# Altium PCB PCB_ARC_1.0.5.PcbDoc (part 4 of 4)
Units mil, origin at the board's own origin, x right, y up, seen from the top; angles counter-clockwise.
Board outline 3621 x 2945 mil, 2 copper layers (Top Layer, Bottom Layer), stack 62 mil thick; 201 components, 125 nets, 582 pads, 196 vias.
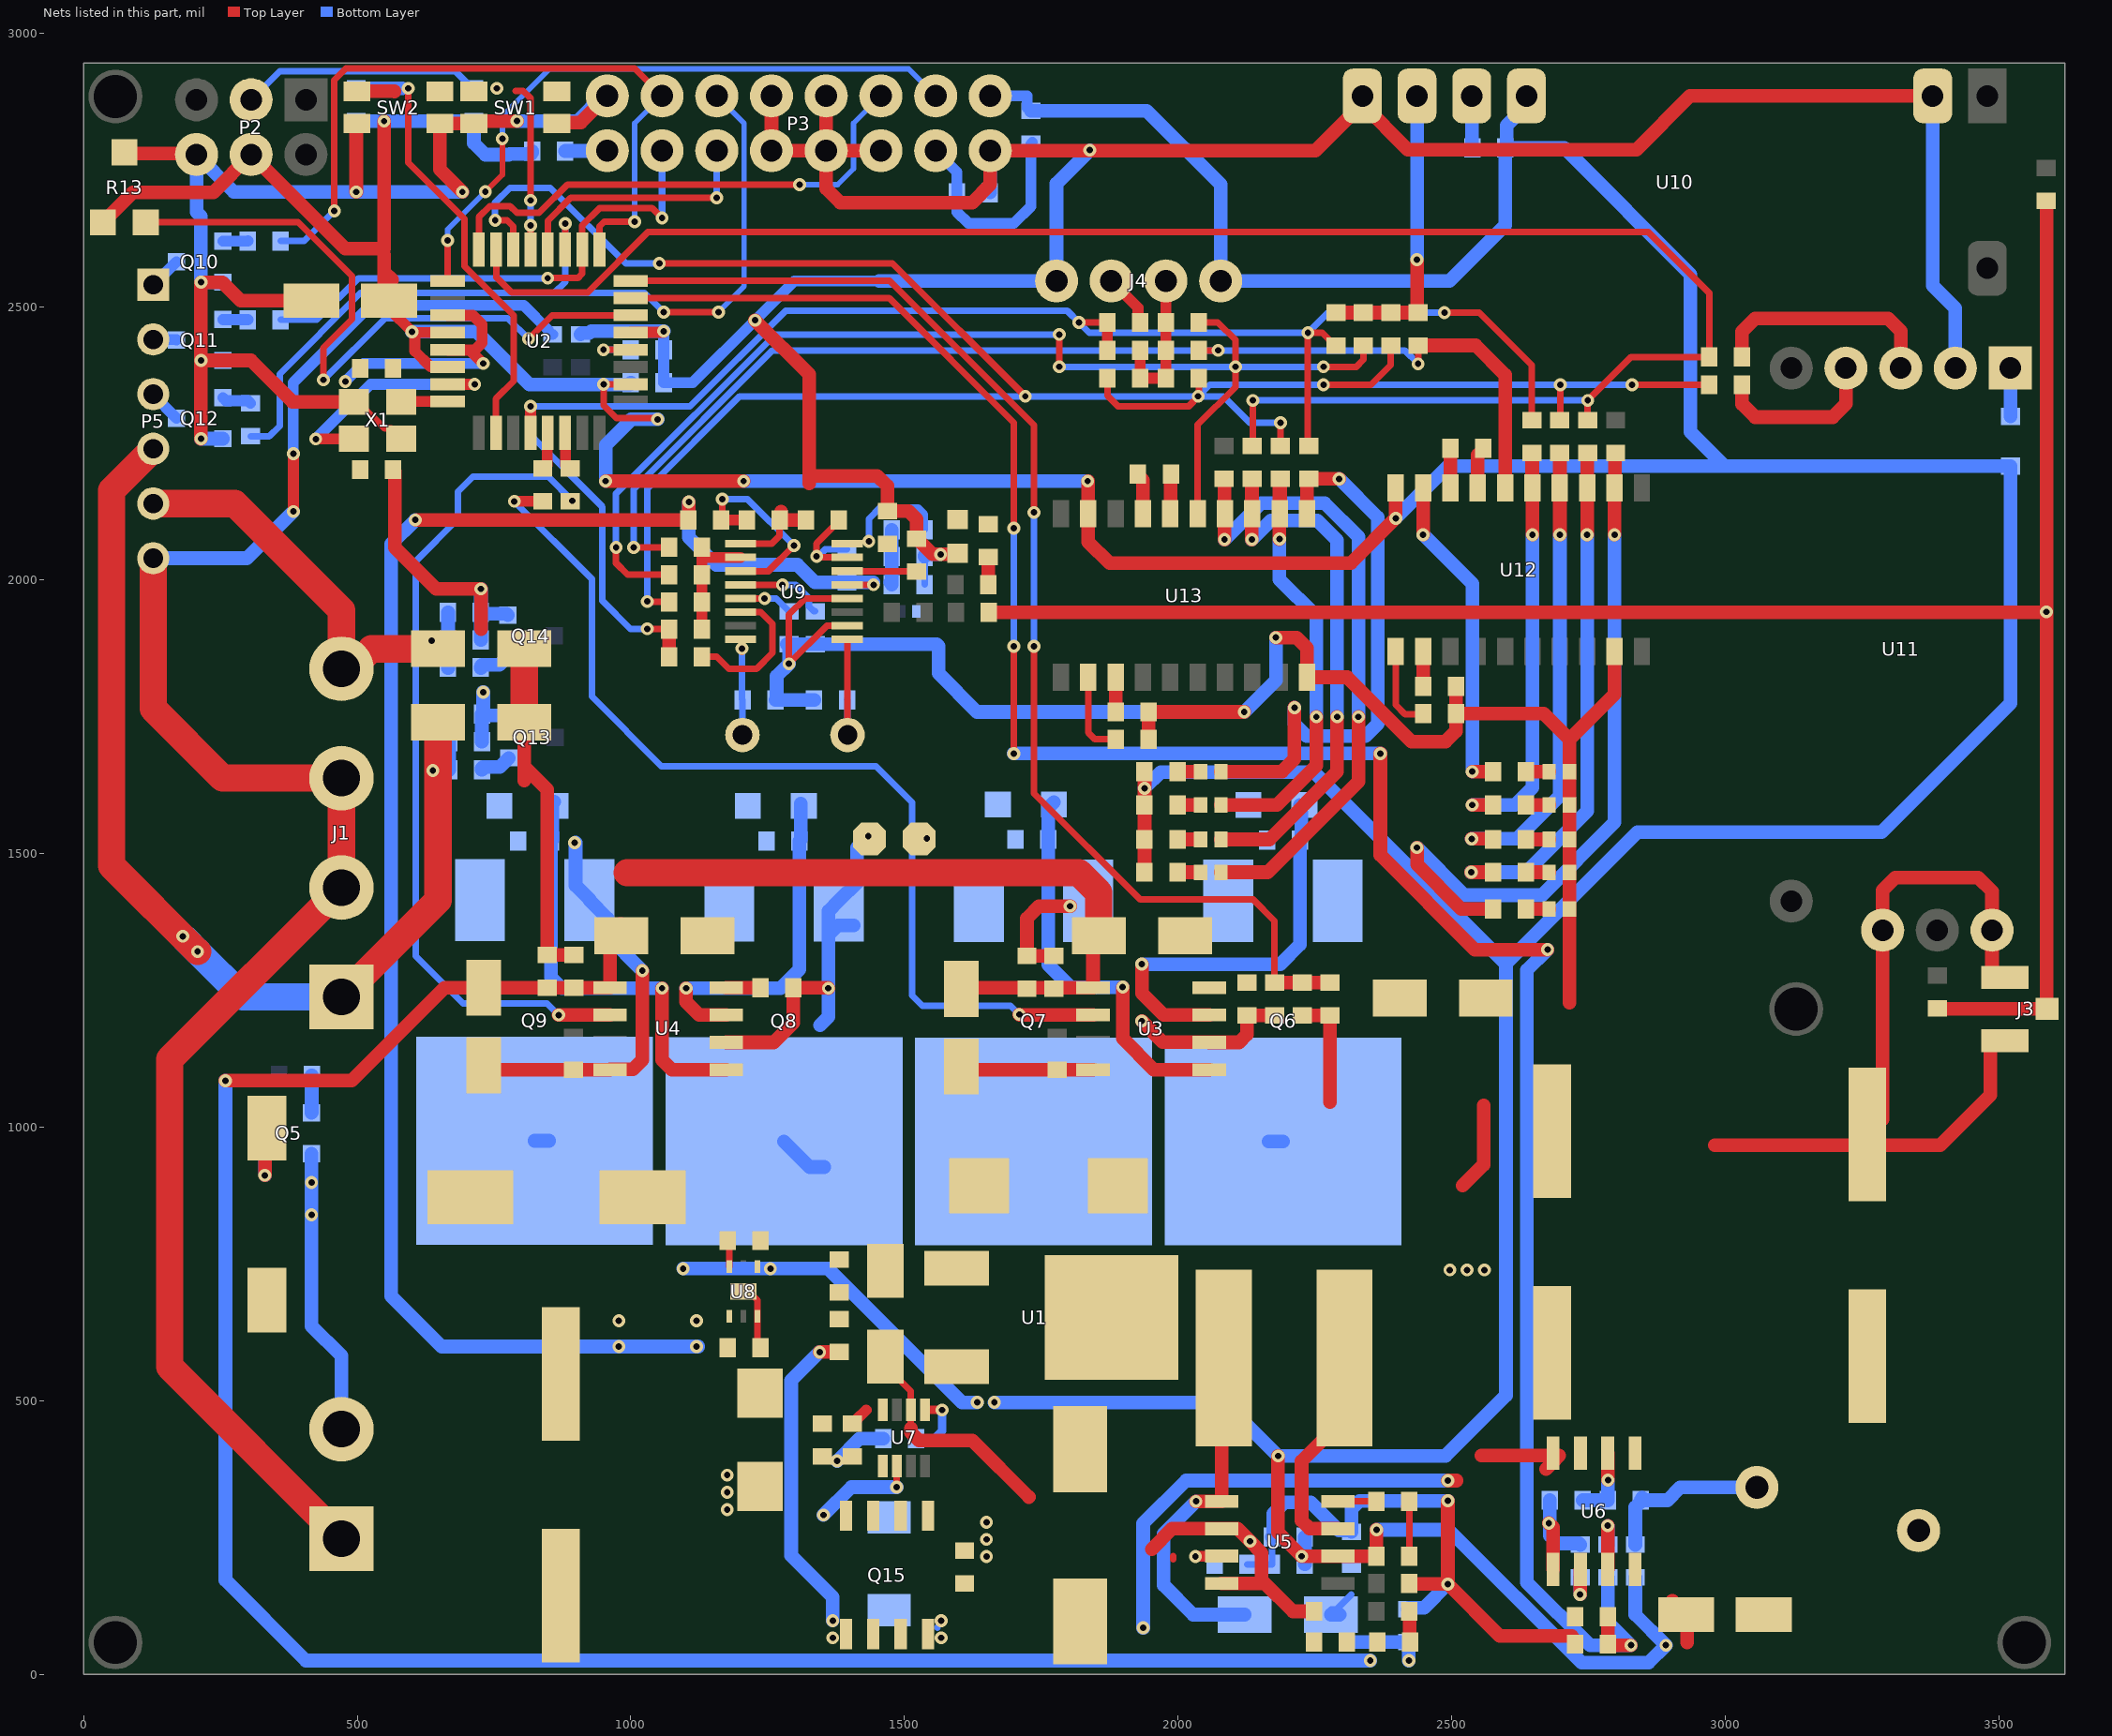
[diagram p2: the nets of this part, all layers, seen from the top]

## Via types
v1: diameter 23.62, hole 11.81, Top Layer to Bottom Layer, tented both sides, 195 vias
v2: diameter 23.62, hole 11.81, Top Layer to Bottom Layer, 1 vias

## Nets (pads, with @x,y where several pads share a name; then routed paths per layer and width w, separated by ;. In a path a pad name is that pad's centre, name@x,y a point inside that pad or via, vN(x,y) a via of type N, cw(c..) or ccw(c..) an arc to the next point about the centre after c; other vN are vias at no path point) (continued)
CRNT_SNS: C29.1 R34.1 R35.2 U2.23 | length 4275.8
  Top Layer w12: U2.23@999.65,2515.5 1472.5,2515.5 1700,2288 v1(1700,2095) ; v1(1700,1683) v1(1700,1879)
  Top Layer w25: v1(2370,1683) 2370,1497 2542.5,1324.5 v1(2675.5,1324.5) ; R35.2@2786,51 R35.2@2786,55 R35.2@2786,62 ; C29.1@2786,101 R35.2@2786,62 ; R35.2@2787,53 v1(2828,53) ; R35.2@2787,61 R35.2@2786,62
  Bottom Layer w12: v1(1700,1879) v1(1700,2095)
  Bottom Layer w25: v1(1700,1683) v1(2370,1683) ; v1(2675.5,1324.5) 2638,1287 2638,168 2753,53 v1(2828,53) 2785.78,95.22 R34.1@2785.78,176.7
D0: R44.2 SB32.1 U12.15 | length 772.7
  Top Layer w25: v1(2538,1589) R44.2@2576,1589 ; SB32.1@2647,2232 2647.5,2231.5 2647.5,2169.11 U12.15@2648,2168.61 v1(2648,2083)
  Bottom Layer w25: v1(2538,1589) 2616,1589 2648,1621 v1(2648,2083)
D1: R45.2 SB33.1 U12.14 | length 859.7
  Top Layer w25: v1(2537,1527) 2575,1527 R45.2@2576,1526 ; v1(2698,2083) U12.14@2698,2168.61 SB33.1@2698,2232
  Bottom Layer w25: v1(2537,1527) 2620,1527 2698,1605 v1(2698,2083)
D2: R46.2 SB34.1 U12.13 | length 952.8
  Top Layer w25: v1(2536,1466) R46.2@2576,1466 ; v1(2748,2083) U12.13@2748,2168.61 2748.5,2169.11 2748.5,2231.5 SB34.1@2749,2232
  Bottom Layer w25: v1(2536,1466) 2636,1466 2748,1578 v1(2748,2083)
D3: R47.2 SB35.1 U12.12 | length 1331.5
  Top Layer w25: v1(2437,1511) 2437,1480 2518,1399 R47.2@2576,1399 ; v1(2798,2083) U12.12@2798,2168.61 2799,2169.61 2799,2231 SB35.1@2800,2232
  Bottom Layer w25: v1(2437,1511) 2524,1424 2665,1424 2798,1557 v1(2798,2083)
D8: LED1.2 SB16.1 U13.11 | length 1035.7
  Top Layer w25: LED1.2@2078.7,1650 2190,1650 2213,1673 v1(2213,1767) ; U13.11@2236,2121.61 2236,2182.5 2238.5,2185 SB16.1@2239,2185 v1(2294.61,2185)
  Bottom Layer w25: v1(2213,1767) 2213,1737 2235,1715 2343,1715 2365,1737 2365,2114.61 v1(2294.61,2185)
D9: LED2.2 SB17.1 U13.12 | length 819.6
  Top Layer w25: LED2.2@2078.7,1589 2181,1589 2253,1661 v1(2253,1750) ; v1(2185.67,2074.97) SB17.1@2185.67,2184.67 ; U13.12@2186,2121.61 2186.67,2122.27 2186.67,2184.33 SB17.1@2187.33,2185
  Bottom Layer w25: v1(2185.67,2074.97) 2185.67,2001.33 2253,1934 v1(2253,1750)
D10: LED3.2 SB18.1 U13.13 | length 1045
  Top Layer w25: LED3.2@2078.7,1526 2167,1526 2291,1650 v1(2291,1750) ; v1(2135,2074.3) SB18.1@2135,2184 ; SB18.1@2135.67,2185 2135.83,2184.83 2135.83,2121.77 U13.13@2136,2121.61
  Bottom Layer w25: v1(2135,2074.3) 2169.7,2109 2254.75,2109 2291,2072.75 v1(2291,1750)
D11: LED4.2 SB19.1 U13.14 | length 1176.5
  Top Layer w25: LED4.2@2078.7,1466 2164,1466 2330,1632 v1(2330,1750) ; SB19.1@2084,2185 2085,2184 v1(2085,2074.3)
  Bottom Layer w25: v1(2085,2074.3) 2151.7,2141 2268,2141 2330,2079 v1(2330,1750)
DIN_HT12: SB22.2 SB23.2 SB29.2 U13.15 | length 2238.1
  Top Layer w12: v1@970,2062 v1@971.58,2060.42 ; v1(973,2060) 973,2031 994,2010 SB29.2@1070,2010 ; v1(1783,2390) v1(1783,2449) ; U13.15@2036,2121.61 2036,2284 2105,2353 v1(2105,2390) 2105,2439 2073,2471 SB23.2@2038,2471 ; v1(2266,2390) 2326,2390 2339,2403 SB22.2@2339,2429
  Bottom Layer w12: v1(973,2060) 973,2158.08 1263.92,2449 v1(1783,2449) ; v1(1783,2390) v1(2105,2390) v1(2266,2390)
DIN_PT2272: SB20.2 SB21.2 SB28.2 U12.16 | length 2177.3
  Top Layer w12: v1(1005.19,2060) SB28.2@1070,2060 ; SB21.2@2038,2420 v1(2073.67,2420) ; v1(2439,2395.33) SB20.2@2439,2429
  Top Layer w25: SB20.2@2439,2429 2544,2429 2598,2375 U12.16@2598,2168.61
  Bottom Layer w12: v1(1005.19,2060) 1005.19,2166.23 1258.96,2420 v1(2073.67,2420) 2414.33,2420 v1(2439,2395.33)
DOUT_MICRF: SB28.1 SB29.1 SB30.1 SB31.1 U9.10 | length 220.6
  Top Layer w20: SB31.1@1130,1910 SB30.1@1130,1960 SB29.1@1130,2010 1130,2041.5 ; SB28.1@1130,2060 1130,2041.5 ; U9.10@1200.56,2041.5 1130,2041.5
DOUT_SRX882: SB20.1 SB22.1 SB24.1 SB26.1 U10.5 | length 543.2
  Top Layer w25: SB26.1@2289,2489 SB22.1@2339,2489 SB24.1@2389,2489 SB20.1@2439,2489 2437,2491 v1@2437,2583 ; U10.5@2437,2885 U10.5@2438,2884
  Bottom Layer w25: v1@2437,2588 U10.5@2437,2885
  other v1: 2437,2586
DRV_IN: SB1.1 U3.2 | length 1831.4
  Top Layer w20: v1(787.02,2144) SB1.1@839,2144
  Top Layer w25: v1(1710,1206) 1711,1205 U3.2@1844.7,1205
  Bottom Layer w12: v1(787.02,2144) 929,2002.02 929,1787 1056,1660 1448,1660 1514,1594 1514,1241 1533,1222 1694,1222 v1(1710,1206)
DRV_IN2: SB6.1 U4.2 | length 1519.7
  Top Layer w25: v1(868,1205) U4.2@961.7,1205
  Bottom Layer w12: v1(868,1205) 847,1226 693,1226 606.5,1312.5 606.5,2034.5 683.75,2111.75 683.75,2161.75 711,2189 849,2189 v1(893,2145)
DT: J4.2 SB4.2 SB21.1 SB23.1 SB25.1 SB27.1 | length 273.5
  Top Layer w20: SB27.1@1931,2420 SB25.1@1931,2369 ; SB25.1@1932,2367 1931,2368 SB25.1@1931,2369 ; SB4.2@1977,2378 1978,2379 SB21.1@1978,2420 SB23.1@1978,2471 J4.2@1978,2547 ; SB4.2@1980,2373 1976,2369 SB25.1@1931,2369
EXT_RF: J3.1 SB9.2 SB10.2 SB11.2 | length 3608.9
  Top Layer w25: SB9.2@1654,1941 3586.5,1941 v1(3587.5,1942) ; SB11.2@3389,1216 J3.1@3588.35,1216 ; J3.1@3587.5,1216.85 v1(3587.5,1942) ; SB10.2@3587.5,2692.5 v1(3587.5,1942)
GATE: Q15.4 U7.6 | length 192.4
  Top Layer w12: U7.6@1486.2,380.82 1486.2,345.61 v1@1487.81,344
  Bottom Layer w25: v1(1352,291) 1403,342 v1(1485.81,342)
GND: C1.2 C2.2 C3.2 C4.2 C5.2 C7.2 C8.2 C9.1 C10.1 C11.2 C12.2 C13.2 C16.2 C17.2 C18.2 C19.2 C20.2 C21.1 C22.2 C23.2 C24.2 C25.2 C26.1 C27.1 C28.2 C29.2 C30.2 C31.2 C32.2 C33.2 C34.2 C35.2 C36.2 C38.2 C39.2 C40.2 C41.2 C42.2 C43.1 C44.1 C45.2 C49.2 c.2 D1.2 D4.2 D6.1 D7.1 D9.2 D10.2 J2.2 J3.2 J3.3 J4.4 L2.2 L3.2 LED5.2 LED6.2 LED7.2 LED8.2 LED9.2 P2.6 P3.1 P3.5 P3.7 P3.8 P3.9 P3.10 P3.16 Q5.2 Q7.3 Q9.3 Q10.2 Q11.2 Q12.2 Q13.2 Q14.2 R3.2 R8.1 R13.3 R14.2 R15.2 R17.1 R21.1 R26.2 R30.2 R31.2 R35.1 RV1.2 SB2.2 SB7.2 SB8.2 SB14.1 SB15.1 SB36.1 SB37.1 SW1.2 SW2.2 U1.2 U2.3 U2.5 U2.21 U3.4 U4.4 U5.2 U5.4 U6.5 U7.2 U8.3 U8.7 U9.2 U9.4 U9.9 U10.2 U10.6 U11.2 U11.7 U11.8 U12.9 U13.10 X1.2 X1.4 | length 19624.5
  Top Layer w12: X1.4@493.69,2325.46 501.54,2325.46 550,2277 561.84,2277 X1.2@580.31,2258.54 ; U9.9@1200.56,2066.5 1257.5,2066.5 1272,2081 SB7.2@1272,2110 ; U8.7@1214,706 1214,700.17 1223.21,690.96 1224.15,690.96 1231.18,683.93 U8.3@1231.18,654.45 1231.18,593.82 C45.2@1234,591 ; U9.2@1395.44,1916.5 1358.5,1916.5 v1(1289,1847) 1289,1937 1318.5,1966.5 U9.4@1395.44,1966.5 ; D10.2@1465,580.26 1465,564.51 1511.8,517.72 U7.2@1511.8,483.18 1511.8,449.2 ; 1991,210 1991,216
  Top Layer w20: U2.3@665,2484 711,2484 728,2467 728,2434.01 715,2421.01 U2.5@665,2421.01 665.83,2420.18 705.82,2420.18 v1(730,2396) ; U2.21@999.65,2452.5 1000.14,2453 v1@1060,2453
  Top Layer w25: R13.3@74,2781.98 75.98,2780 117,2780 ; 115.02,2779.99 204.01,2779.99 P2.6@206,2778 ; v1(214.3,2258.6) v1(214.3,2401.6) ; c.2@418,2512.87 c.2@416.13,2511 287,2511 253.4,2544.6 v1(214.3,2544.6) v1(214.3,2401.6) ; X1.4@493.69,2325.46 381.54,2325.46 305.4,2401.6 v1(214.3,2401.6) ; v1(498,2709.63) 498,2835 498.53,2834.47 SW2.2@499.21,2834.47 ; C9.1@565.35,2202 568.35,2199 568.35,2059.65 644,1984 v1(726,1984) 726,1910 ; v1(692,2709.63) 650.79,2750.84 SW2.2@650.79,2834.47 SW1.2@713.21,2834.47 718.05,2839.31 v1(792,2839.31) ; C16.2@731,1113.13 739.13,1105 R15.2@895,1105 U4.4@961.7,1105 962.39,1105.69 1003.69,1105.69 1021,1123 v1(1021,1286) ; 805.06,1633.94 805.06,1658.94 ; D6.1@805.06,1715.41 805.06,1658.94 ; SW1.2@864.79,2834.47 866.62,2836.31 908.31,2836.31 P3.16@957,2885 ; C17.2@896,1315 C18.2@847,1315 847,1617 805.06,1658.94 ; v1(1227,2475) 1326,2376 1326,2177 ; P3.10@1257,2885 P3.9@1257,2785 P3.7@1357,2785 ; SB7.2@1274.5,2125.5 1274.5,2112.5 SB7.2@1272,2110 SB8.2@1320,2110 ; 1339.5,2190.5 1450.5,2190.5 1469,2172 R8.1@1469,2126 1507.36,2126 1522,2111.36 SB2.2@1522,2076 1524.5,2076 1527,2073.5 1527,2071 1551,2047 v1(1566,2047) 1594.91,2047 L3.2@1597,2049.09 ; P3.8@1357,2885 P3.7@1357,2785 ; P3.5@1457,2785 P3.7@1357,2785 ; 1511.8,449.2 1511.8,442.21 1526.44,427.57 1623.82,427.57 1727.39,324 ; C11.2@1604,1111.13 1610.13,1105 R14.2@1779,1105 U3.4@1844.7,1105 ; C12.2@1773,1313 C13.2@1724,1313 1724,1382 1746,1404 v1(1803,1404) ; SB14.1@1946,1709 SB15.1@1946,1759 v1(2121,1759) ; 1952,228.5 1989.5,266 U5.2@2079.7,266 2109,266 v1(2132,243) 2153,222 2153,172 2159,166 ; U5.4@2079.7,166 2159,166 ; v1(2179,1895) 2217,1895 2236,1876 U13.10@2236,1822.39 2309.61,1822.39 2427,1705 2489,1705 2508,1724 SB36.1@2508,1756 ; R17.1@2227.33,1204 C28.2@2278,1204 2278,1046 ; R21.1@2249,115 2210,115 2159,166 ; U10.6@2337,2885 U10.6@2337,2870.43 ; C24.2@2423,166 2424.5,166 2425.5,165 v1@2493.3,165 ; v1(2493.3,164.85) v1@2493.3,165 ; v1(2493.3,317) v1@2493.3,165 ; SB37.1@2508,1806 SB36.1@2508,1756 ; 2520.5,893 2559,931.5 2559,1040 ; v1(2678,276) 2685.56,268.44 U6.5@2685.56,191.7 ; 2715.7,1227.7 LED8.2@2715.7,1399 LED7.2@2715.7,1466 LED6.2@2715.7,1526 LED5.2@2715.7,1589 LED9.2@2715.7,1650 2715.7,1708.7 ; R35.1@2720,68 R35.1@2726,62 ; R35.1@2720,70 2588.3,70 v1@2493.3,165 ; U12.9@2798,1869.39 2798,1791 2715.7,1708.7 ; 2981,967 3393,967 3484.65,1058.65 J3.3@3484.65,1157.93 ; C34.2@3260,986.56 3288,1014.56 U11.8@3288,1360 3288,1433 3311,1456 3463,1456 3488,1431 U11.7@3488,1360 J3.2@3488,1277.43 ; U10.2@3379.52,2885 2936,2885 2838,2787 2420.43,2787 U10.6@2337,2870.43 ; P3.7@1357,2785 1357,2716 1383,2690 1624,2690 1657,2723 P3.1@1657,2785 1839,2785 2251.57,2785 U10.6@2337,2870.43 ; SB36.1@2508,1756 2668.4,1756 2715.7,1708.7
  Top Layer w50: D6.1@805.06,1740.41 D7.1@805.06,1874.41
  Bottom Layer w12: C40.2@1536.78,1992 C41.2@1536.78,2043 ; C21.1@2127,201 C20.2@2172,201 C19.2@2172,251
  Bottom Layer w20: v1(478,2363) 511,2396 v1(730,2396) ; v1(1060,2455) C8.2@1060,2421 C7.2@1060,2361 1113,2361 v1(1227,2475) 1299,2547 1454,2547 ; R26.2@1656,2708 R26.2@1656.5,2708.5 ; P3.1@1656.5,2785.5 P3.1@1657,2786
  Bottom Layer w25: v1(214.3,2258.6) Q12.2@254.32,2258.6 ; v1(214.3,2401.6) Q11.2@254.32,2401.6 ; Q10.2@254.32,2544.6 v1(214.3,2544.6) 214.3,2664.7 206,2673 P2.6@206,2778 274.37,2709.63 v1(498,2709.63) v1(692,2709.63) ; Q5.2@416.32,951.6 v1(416.32,899) v1(416.32,840) 416.32,636.68 471,582 J2.2@471,448 ; R31.2@725.85,1890.39 C27.1@725.85,1941.09 ; v1@725.85,1984 C27.1@725.85,1941.39 C27.1@725.85,1941.09 ; R30.2@727.65,1704.41 C26.1@727.65,1755.11 ; C26.1@727.65,1755.41 C26.1@727.65,1755.11 ; v1@730.15,1795.22 C26.1@730.15,1752.61 ; Q14.2@775.2,1935.78 772.4,1938.59 728.35,1938.59 C27.1@725.85,1941.09 ; Q13.2@777,1749.8 774.2,1752.61 C26.1@730.15,1752.61 ; v1(792,2839.31) 902.6,2839.31 948.29,2885 P3.16@957,2885 ; v1@899,1520 899,1441.88 925,1415.88 Q9.3@924,1414.88 957.17,1381.71 957.17,1349.83 v1(1021,1286) ; R3.2@908,2449 910.5,2451.5 924.14,2451.5 927.64,2455 v1(1060,2455) ; C25.2@1284.62,1883 C25.2@1289,1883 ; C43.1@1335,1781 C44.1@1264,1781 1266.5,1783.5 1266.5,1824.5 v1(1289,1847) C25.2@1289,1883 ; 1454,2547 J4.4@1778,2547 1778,2725 v1(1839,2786) ; C41.2@1536.78,2043 1536.78,2044.5 1539.28,2047 v1(1566,2047) ; R26.2@1656.5,2708.5 P3.1@1656.5,2785.5 ; C19.2@2172,251 2174.5,253.5 2174.5,293.5 2195,314 2243,314 2294.5,262.5 2314.5,262.5 C23.2@2317,260 2317,302.36 2331.64,317 v1(2493.3,317) ; v1(2179,1895) 2179,1817 v1(2121,1759) 1633,1759 1562.5,1829.5 1562.5,1879.5 1559,1883 C42.2@1337,1883 C25.2@1289,1883 ; C22.2@2420,119 2422.5,121.5 2449.95,121.5 v1(2493.3,164.85) ; C35.2@2680,318 2680,253.85 2694.64,239.2 2733.06,239.2 C31.2@2735.56,236.7 ; C32.2@2836,236.7 2836,305.5 C36.2@2848.5,318 ; C36.2@2846,318 C36.2@2848.5,318 ; C36.2@2848.5,323 C36.2@2848.5,318 ; RV1.2@3058.36,341.37 2918.16,341.37 2894.79,318 C36.2@2848.5,318 ; U10.2@3379.52,2885 3379.52,2538.48 3421.07,2496.93 U11.2@3421.07,2387.56 ; C26.1@727.65,1755.11 C26.1@730.15,1752.61
  other v1: 1650,215 1650,246.5 1650,278 897,1520 730.3,1795.22
HO: D5.1 R18.1 U3.7 | length 754.3
  Top Layer w25: v1(1934,1298) 1934,1244.42 1973.42,1205 U3.7@2057.3,1205
  Bottom Layer w25: v1(1934,1298) 2187,1298 2223.1,1334.1 R18.1@2223.1,1525 2225.6,1527.5 2225.6,1586.4 D5.1@2223,1589
HO2: D12.1 R36.1 U4.7 | length 634
  Top Layer w25: v2(1101,1254) 1101,1229 1125,1205 U4.7@1174.3,1205
  Bottom Layer w25: v2(1101,1254) 1274,1254 1308.11,1288.11 R36.1@1308.11,1523 1310.61,1525.5 D12.1@1310.61,1591.61
IPK_SNS: L1.2 R20.1 R22.1 U5.7 | length 514.9
  Top Layer w12: R20.1@2414,307 R20.1@2423,316 2423,246 R22.1@2423,216
  Top Layer w25: U5.7@2292.3,266 2240.64,266 2226,280.64 2226,389.53 2304.24,467.76 L1.2@2304.24,578
IPP: C33.1 C34.1 C35.1 C36.1 Q6.2 Q8.2 RV1.1 U6.1 U6.2 | length 251.5
  Top Layer w25: v1@2785.56,355.44 U6.2@2785.56,404.3
  Bottom Layer w25: Q8.2@1280,974.12 1327,927.12 Q8.2@1353.57,927.12 ; Q6.2@2165.43,974 Q6.2@2192,974 ; C35.1@2740,318 C36.1@2786,318 v1(2786,355)
  other v1: 2497,739 2528.5,739 2560,739
LCD_4: P3.4 U2.1 | length 1190.7
  Top Layer w10: v1(734,2710) 765,2741 v1(765,2807)
  Top Layer w12: U2.1@665,2546.99 v1(665,2621)
  Bottom Layer w10: v1(665,2621) 665,2641 v1(734,2710) ; v1(765,2807) 765,2848 851.37,2934.37 1507.63,2934.37 P3.4@1557,2885
LCD_11: P3.11 U2.28 | length 466.3
  Top Layer w12: U2.28@848.07,2604.08 848.07,2657.07 890,2699 v1(1157,2699)
  Bottom Layer w12: v1@1157,2698 P3.11@1157,2785
LCD_12: P3.12 R42.1 U2.27 | length 1651.8
  Top Layer w12: U2.27@880,2604.51 879.78,2604.73 879.78,2651.78 v1(880,2652) ; v1(1060,2490) v1(1160,2490)
  Bottom Layer w10: P3.12@1157,2885 1207,2835 1207,2537 v1(1160,2490)
  Bottom Layer w12: R42.1@305,2263 339,2263 358,2282 358,2377 506,2525 860,2525 ; v1(880,2652) 880,2545 860,2525 ; v1(1060,2490) 1025,2525 860,2525
LCD_13: P3.13 R41.1 U2.26 | length 963.5
  Top Layer w12: v1(848,2552) 903,2552 911.06,2560.06 U2.26@911.06,2604.08 911.06,2648.06 943,2680 1039,2680 v1(1057,2662)
  Bottom Layer w12: R41.1@360,2476 426,2476 501.93,2551.93 v1@848,2551.93 ; v1(1057,2662) P3.13@1057,2785
LCD_14: P3.14 R40.1 U2.25 | length 1349.6
  Top Layer w12: v1(458,2675) 458,2914 479.37,2935.37 1006.63,2935.37 P3.14@1057,2885 ; U2.25@942.56,2604.08 942.56,2646.56 951,2655 v1(1007,2655)
  Bottom Layer w10: v1(1007,2655) 1007,2835 P3.14@1057,2885
  Bottom Layer w12: R40.1@360,2620 403,2620 v1(458,2675)
LCD_EN: P3.6 U2.32 | length 945.3
  Top Layer w12: U2.32@722.09,2604.08 722.09,2664.09 741.81,2683.81 779.38,2683.81 791.81,2671.38 832.38,2671.38 884,2723 v1(1308.48,2723)
  Bottom Layer w10: v1(1308.48,2723) 1378,2723 1407,2752 1407,2835 P3.6@1457,2885
LO: D8.1 R33.1 U3.5 | length 730
  Top Layer w25: v1(1899,1256) 1899,1162 1956,1105 U3.5@2057.3,1105
  Bottom Layer w25: D8.1@1773,1594 1763,1584 R33.1@1763,1526 1763,1297 1804,1256 v1(1899,1256)
LO2: D13.1 R37.1 U4.5 | length 790.4
  Top Layer w25: v1(1057,1254) 1057,1123 1075,1105 U4.5@1174.3,1105
  Bottom Layer w25: D13.1@860,1595 856.62,1591.61 856.62,1525.5 R37.1@854.12,1523 854.12,1273.89 874,1254 v1(1057,1254)
MCU_RX: SB4.1 SB13.2 SB17.2 SB24.2 SB25.2 SB30.2 SB33.2 U2.30 | length 4212.4
  Top Layer w12: v1(752,2658) 774,2658 785.08,2646.92 U2.30@785.08,2604.08 ; v1(1030,1961) 1030.5,1960.5 1069.5,1960.5 SB30.2@1070,1960 ; v1(1052,2579) 1478,2579 v1(1721,2336) ; SB25.2@1871,2369 1871,2337 1890,2318 2020,2318 v1@2037.5,2335.5 ; v1@2038,2336 SB4.1@2038,2369 ; SB17.2@2187.33,2245 v1(2187.33,2287.67) ; v1(2266,2357) 2353,2357 2389,2393 SB24.2@2389,2429 ; SB33.2@2699,2293 v1(2699,2357) ; v1(2830,2357) SB13.2@2971,2357
  Top Layer w25: SB33.2@2698,2292 SB33.2@2699,2293
  Bottom Layer w12: v1@752,2661 752,2690 779,2717 853,2717 991,2579 v1(1052,2579) ; v1(1030,1961) 1030,2167 1199,2336 1744,2336 v1(2037,2336) v1@2037.16,2336 ; v1(2187.33,2287.67) 2131.33,2287.67 2083,2336 v1@2037.16,2336 ; v1(2830,2357) v1(2699,2357) v1(2266,2357) 2058.16,2357 v1@2037.16,2336
MCU_TX: SB12.2 SB18.2 SB34.2 U2.31 | length 3474.9
  Top Layer w12: U2.31@753.58,2604.08 754.39,2603.27 754.39,2553.61 782,2526 921,2526 1031,2636 2860,2636 2971,2525 SB12.2@2971,2408 2828.5,2408 v1(2749,2328.5) SB34.2@2749,2292 ; SB18.2@2135.67,2245 2137,2246.33 v1(2137,2328.5)
  Bottom Layer w12: v1(2137,2328.5) v1(2749,2328.5)
NetC8_1: C8.1 U2.20 | length 99.6
  Top Layer w12: v1(950,2421) U2.20@999.65,2421.01
  Bottom Layer w12: v1(950,2421) C8.1@1000,2421
NetC21_2: C21.2 U5.3 | length 48.5
  Top Layer w20: v1(2032,215) 2032.5,215.5 2078.21,215.5 2078.7,215 U5.3@2079.7,216
NetC25_1: C25.1 U9.13 | length 98.2
  Top Layer w12: U9.13@1200.56,1966.5 v1(1244.5,1966.5)
  Bottom Layer w12: v1(1244.5,1966.5) 1244.75,1966.25 1265.75,1966.25 C25.1@1289,1943
NetC31_1: C31.1 U6.6 | length 76.1
  Top Layer w25: v1(2735,146) U6.6@2735,191.14
  Bottom Layer w25: v1(2735,146) 2735,176.14 C31.1@2735.56,176.7
NetC37_1: C37.1 U7.4 | length 37.1
  Top Layer w20: C37.1@1405,458 1407.5,458 1412.5,463 1412.5,465.5 1430.18,483.18
NetC42_1: C42.1 U9.12 | length 165.6
  Top Layer w12: U9.12@1200.56,1991.5 1200.75,1991.31 1276.69,1991.31 v1(1277,1991)
  Bottom Layer w12: v1(1277,1991) 1302,1991 1325.5,1967.5 1325.5,1952 1334.5,1943 C42.1@1337,1943
NetC48_2: C48.2 SB3.1 | length 50
  Top Layer w25: SB3.1@1653,1992 C48.2@1653,2042
NetD5_2: D5.2 Q6.1 R18.2
NetD8_2: D8.2 Q7.1 R33.2
NetD11_2: D11.2 L1.1 U5.1 | length 704.5
  Top Layer w25: U5.1@2079.7,316.69 2079.7,573.94 L1.1@2083.76,578 ; v1(2033,316) U5.1@2079.7,316 v1(2033,316)
  Bottom Layer w25: v1(2033,316) 1974,257 1974,163 2028,109 D11.2@2122.26,109
NetD12_2: D12.2 Q8.1 R36.2
NetD13_2: D13.2 Q9.1 R37.2
NetD14_1: D14.1 U11.1 | length 88.7
  Bottom Layer w25: U11.1@3521.07,2387.56 3522,2386.63 D14.1@3522,2299.28
NetJ4_3: J4.3 SB5.2 | length 98
  Top Layer w20: J4.3@1878,2547 1927.05,2497.95 1927.05,2474.95 SB5.2@1931,2471
NetLED1_1: LED1.1 R12.1 | length 42.3
  Top Layer w25: R12.1@1999,1650 LED1.1@2041.3,1650
NetLED2_1: LED2.1 R24.1 | length 42.3
  Top Layer w25: R24.1@1999,1589 LED2.1@2041.3,1589
NetLED3_1: LED3.1 R32.1 | length 42.3
  Top Layer w25: R32.1@1999,1526 LED3.1@2041.3,1526
NetLED4_1: LED4.1 R43.1 | length 42.3
  Top Layer w25: R43.1@1999,1466 LED4.1@2041.3,1466
NetLED5_1: LED5.1 R44.1 | length 42.3
  Top Layer w25: R44.1@2636,1589 LED5.1@2678.3,1589
NetLED6_1: LED6.1 R45.1 | length 42.3
  Top Layer w25: R45.1@2636,1526 LED6.1@2678.3,1526
NetLED7_1: LED7.1 R46.1 | length 42.3
  Top Layer w25: R46.1@2636,1466 LED7.1@2678.3,1466
NetLED8_1: LED8.1 R47.1 | length 42.3
  Top Layer w25: R47.1@2636,1399 LED8.1@2678.3,1399
NetLED9_1: LED9.1 R49.1 | length 42.3
  Top Layer w25: R49.1@2636,1650 LED9.1@2678.3,1650
NetLS1_2: LS1.2 Q5.3 | length 165.4
  Top Layer w25: v1(331,912) 331,994.48 LS1.2@335,998.48
  Bottom Layer w25: v1(331,912) 331.68,912.68 Q5.3@331.68,989.01
NetP3_15: P3.15 R27.1 | length 82.4
  Bottom Layer w25: R27.1@880,2784 880.5,2784.5 961.5,2784.5 P3.15@962,2784
NetQ5_1: Q5.1 R5.1 | length 68.9
  Bottom Layer w25: Q5.1@416.32,1026.41 416.66,1026.75 416.66,1094.66 R5.1@417,1095
NetQ10_1: Q10.1 R40.2 | length 45.9
  Bottom Layer w20: Q10.1@254.32,2619.41 254.62,2619.7 299.7,2619.7 R40.2@300,2620
NetQ11_1: Q11.1 R41.2 | length 45.8
  Bottom Layer w20: Q11.1@254.32,2476.41 254.53,2476.2 299.8,2476.2 R41.2@300,2476
NetQ12_1: Q12.1 R42.2 | length 55
  Bottom Layer w20: Q12.1@254.32,2333.41 259.73,2328 300,2328 R42.2@305,2323
NetQ13_1: Q13.1 R28.2 | length 59.8
  Bottom Layer w25: R28.2@727.65,1653.41 727.65,1655.91 730.15,1658.41 760.41,1658.41 Q13.1@777,1675
NetQ14_1: Q14.1 R29.2 | length 60.3
  Bottom Layer w25: R29.2@725.85,1839.39 R29.2@725.85,1840.39 726.46,1841 726.46,1843.5 728.35,1845.39 759.61,1845.39 Q14.1@775.2,1860.98
NetR9_1: R9.1 U7.1 | length 123.5
  Top Layer w12: v1@1568.82,483.18 v1(1569,483)
  Top Layer w15: U7.1@1537.39,483.18 v1@1568.82,483.18
  Bottom Layer w15: R9.1@1521,431 1555,431 1569,445 v1(1569,483)
NetR10_2: R10.2 U10.4 | length 95.4
  Bottom Layer w25: U10.4@2537,2885 2537.5,2884.5 2537.5,2790.5 R10.2@2538,2790
NetR20_2: R20.2 U5.8 | length 70.7
  Top Layer w12: U5.8@2292.3,316 R20.2@2363,316
NetR34_2: R34.2 U6.7 | length 114.7
  Top Layer w25: U6.7@2785.56,191.7 2785.56,236.7 ; v1(2785.56,271.44) 2785.78,271.22 2785.78,236.7
  Bottom Layer w25: v1(2785.56,271.44) 2785.56,236.92 R34.2@2785.78,236.7
NetSB1_2: SB1.2 U2.13 | length 70.7
  Top Layer w20: SB1.2@839,2204 841.5,2204 847.24,2209.74 847.24,2268.61 U2.13@848.07,2269.43
NetSB6_2: SB6.2 U2.14 | length 70.8
  Top Layer w20: U2.14@879.57,2269.43 880.39,2268.61 880.39,2210.11 886.5,2204 SB6.2@889,2204
NetSB14_2: SB14.2 U13.2 | length 156.4
  Top Layer w12: U13.2@1836,1822.39 1836,1721 1848,1709 SB14.2@1886,1709
NetSB15_2: SB15.2 U13.3 | length 63.4
  Top Layer w25: SB15.2@1886,1759 U13.3@1886,1822.39
NetSB36_2: SB36.2 U12.1 | length 153.4
  Top Layer w12: U12.1@2398,1869.39 2398,1772 2415,1755 SB36.2@2447,1755
NetSB37_2: SB37.2 U12.2 | length 63.4
  Top Layer w25: SB37.2@2448,1806 U12.2@2448,1869.39
OSC1_HT12: R11.2 U13.17 | length 76.1
  Top Layer w25: R11.2@1927,2194 1927,2191.5 1936,2182.5 U13.17@1936,2121.61
OSC1_PT: R48.2 U12.18 | length 72.4
  Top Layer w25: U12.18@2498,2168.61 R48.2@2498,2241
OSC2_HT12: R11.1 U13.16 | length 72.8
  Top Layer w25: U13.16@1986,2121.61 1986.5,2122.11 1986.5,2193.5 R11.1@1987,2194
OSC2_PT: R48.1 U12.17 | length 76.5
  Top Layer w25: U12.17@2548,2168.61 2548,2228.5 2558,2238.5 R48.1@2558,2241
PATCH_ANT: C48.1 L3.1
PB0: SB5.1 SB16.2 SB26.2 SB27.2 SB31.2 SB32.2 SB38.2 U2.12 | length 3107
  Top Layer w12: v1(1030,1911) 1030.5,1910.5 1069.5,1910.5 SB31.2@1070,1910 ; v1(1819,2471) SB5.1@1871,2471 ; SB16.2@2239,2245 2237.5,2246.5 v1(2237.5,2452) 2263.5,2452 2286.5,2429 SB26.2@2289,2429 ; v1(2487,2489) 2551,2489 2647,2393 SB32.2@2647,2292
  Top Layer w20: U2.12@816.57,2269.43 v1(816.57,2317.43) ; SB27.2@1870,2415 1871,2416 SB27.2@1871,2420 SB5.1@1871,2471
  Top Layer w25: SB38.2@1070,1860 SB31.2@1070,1910
  Bottom Layer w12: v1(1030,1911) 999,1911 948.19,1961.81 948.19,2133.81 816.57,2265.43 v1(816.57,2317.43) 1108.3,2317.43 1282.88,2492 1798,2492 v1(1819,2471) 1838,2452 v1(2237.5,2452) 2274.5,2489 v1(2487,2489) v1@2489.22,2486.78
PIN1: C26.2 D6.2 J1.1 P5.4 R28.1 R30.1 | length 2051.8
  Top Layer w50: P5.4@127,2240 51,2164 51,1478 v1(208,1321) ; J1.1@471,1238 647.58,1414.58 D6.2@647.58,1740.41
  Bottom Layer w25: v1(638,1652) 666.24,1652 R28.1@667.65,1653.41 R30.1@667.65,1704.41 C26.2@667.65,1755.41
  Bottom Layer w50: v1@186,1343 v1(208,1321) 291,1238 J1.1@471,1238
  other v1: 181,1349
PIN3: C27.2 D7.2 J1.4 P5.5 R29.1 R31.1 | length 853.7
  Top Layer w50: P5.5@127,2140 276,2140 471,1945 J1.4@471,1838 489.43,1838 525.84,1874.41 D7.2@647.58,1874.41
  Bottom Layer w25: v1(636.2,1888.98) R31.1@664.44,1888.98 ; R29.1@665.85,1839.39 R31.1@665.85,1890.39 C27.2@665.85,1941.39
Q8: P5.3 Q12.3 | length 61.7
  Bottom Layer w20: P5.3@127,2340 127,2338.68 Q12.3@169.68,2296.01
Q9: P5.2 Q11.3 | length 43.1
  Bottom Layer w20: P5.2@127,2440 127.5,2439.5 169.18,2439.5 Q11.3@169.68,2439.01
Q10: P5.1 Q10.3 | length 60.1
  Bottom Layer w20: P5.1@127,2540 163.26,2576.26 163.93,2576.26 Q10.3@169.68,2582.01
RESET: P2.3 R4.1 SW1.1 U2.29 | length 757.6
  Top Layer w12: 789,2894.5 803.07,2894.5 816.57,2881 v1(816.57,2694.19) ; U2.29@816.57,2604.08 v1(816.57,2648.57)
  Top Layer w25: SW1.1@708,2892 709.53,2893.53 SW1.1@713.21,2893.53
  Bottom Layer w12: P2.3@306,2878 358.37,2930.37 679.13,2930.37 710.5,2899 R4.1@713,2899 ; v1(816.57,2648.57) v1(816.57,2694.19)
  other v1: 755,2899
RO1: C43.2 U9.1 X2.1 | length 253.2
  Top Layer w12: U9.1@1395.44,1891.5 1396.06,1890.88 X2.1@1396.06,1717 X2.1@1396.06,1710
  Bottom Layer w12: C43.2@1395,1781 1395.53,1780.47 1395.53,1717.53 X2.1@1396.06,1717 X2.1@1396.06,1710
RO2: C44.2 U9.16 X2.2 | length 186.9
  Top Layer w12: U9.16@1200.56,1891.5 1202.11,1891.5 1203,1890.61 v1(1203,1875) v1@1203,1869
  Bottom Layer w12: v1@1203,1872 1203,1782 C44.2@1204,1781 ; X2.2@1203.94,1710 X2.2@1203.94,1717 ; X2.2@1203.97,1717.03 C44.2@1204,1781
RSSI: SB38.1 U9.14 | length 270.5
  Top Layer w12: SB38.1@1130,1860 1157,1860 1179,1838 1230,1838 1259,1867 1259,1920 1237.5,1941.5 U9.14@1200.56,1941.5
RX_H12: SB12.1 U11.3 | length 423.9
  Top Layer w25: SB12.1@3031,2407 SB12.1@3031,2408 3031,2454 3055,2478 3298,2478 3321.07,2454.93 U11.3@3321.07,2387.56
SEL0: R6.1 SB8.1 U9.7 | length 199.8
  Top Layer w12: v1@1339.5,2042 1340,2041.5 U9.7@1395.44,2041.5 ; v1(1339.61,2043.65) 1339.5,2043.76 1339.5,2067 1380,2107.5 SB8.1@1380,2110
  Bottom Layer w12: v1(1339.61,2043.65) 1342.75,2043.65 1355.11,2056 R6.1@1395,2056
SEL1: R7.1 SB7.1 U9.11 | length 368.7
  Top Layer w12: R7.1@1165,2110 1167,2112 v1(1167,2148) ; U9.11@1200.56,2016.5 1251.5,2016.5 v1(1298,2063)
  Top Layer w20: R7.1@1165,2110 SB7.1@1212,2110
  Bottom Layer w12: v1(1167,2148) 1213,2148 v1(1298,2063)
SHDN: C47.1 R8.2 U9.8 | length 186
  Top Layer w12: R8.2@1468.75,2066.25 R8.2@1469,2066
  Bottom Layer w12: v1(1435,2071) 1435,2112 1456,2133 1525,2133 1537,2121 C47.1@1537,2092
SPEED: R13.2 U2.22 | length 1270.8
  Top Layer w12: R13.2@113.37,2654.02 391.98,2654.02 490,2556 490,2477 438,2425 v1(438,2366) ; v1(813,2441) 856,2484 U2.22@999.65,2484
  Bottom Layer w12: v1(438,2366) 551,2479 775,2479 v1(813,2441)
SPOOL_SNS: C28.1 D4.1 R16.2 R17.2 U2.24 | length 2285.9
  Top Layer w12: U2.24@999.65,2546.99 1473.01,2546.99 1736.77,2283.23 v1(1736.77,2123.77) ; v1(1736.77,1879) 1736.77,1610.23 1931,1416 2137.58,1416 2176.67,1376.91 R16.2@2176.67,1264
  Top Layer w25: R16.2@2176.67,1264 R17.2@2227.33,1264 C28.1@2278,1264 ; D4.1@2389.51,1236 D4.1@2405.26,1236
  Bottom Layer w12: v1(1736.77,1879) v1(1736.77,2123.77)
SQ: SB2.1 U9.6 | length 126.1
  Top Layer w12: U9.6@1395.44,2016.5 SB2.1@1521.5,2016.5
SW2: R23.1 SW2.1 U2.10 | length 889.4
  Top Layer w12: 568,2893 568,2899 ; v1(593,2899) 593,2763 695.93,2660.07 695.93,2573.77 786,2483.7 786,2364.18 753.58,2331.77 U2.10@753.58,2269.43
  Top Layer w25: SW2.1@499.21,2893.53 567.47,2893.53 568,2893 ; SW2.1@650.79,2893.53 657.47,2893.53 SW2.1@658,2893
  Bottom Layer w25: R23.1@498,2899 v1@582,2899
TX_H12: SB13.1 U11.4 | length 311.5
  Top Layer w25: SB13.1@3031,2358 SB13.1@3031,2357 3031,2322 3055,2298 3197,2298 3221.07,2322.07 U11.4@3221.07,2387.56
VB1: C14.2 D2.1 U3.8
VB2: C15.2 D3.1 U4.8 | length 62.7
  Top Layer w25: U4.8@1174.3,1255 C15.2@1237,1255
VCC: C37.2 C38.1 D9.1 J1.2 J1.3 J2.1 P5.6 Q15.1 Q15.2 Q15.3 R2.2 R9.2 U7.5 | length 3505.6
  Top Layer w20: v1(383,2231) 383.06,2230.94 v1(383.06,2125.45)
  Top Layer w50: P5.6@127,2040 127,1765 254,1638 J1.3@471,1638 J1.2@471,1438 157,1124 157,562 J2.1@471,248
  Bottom Layer w20: v1(383,2231) 383,2361 524,2502 804,2502 849.5,2456.5 849.5,2454 854.5,2449 R2.2@857,2449
  Bottom Layer w25: P5.6@127,2040 297.61,2040 v1(383.06,2125.45) ; v1(1377,390) 1418,431 R9.2@1461,431
  other v1: 1176,301 1176,332.5 1176,364
VCC#: C2.1 C39.1 C49.1 D1.1 Q15.5 Q15.6 Q15.7 Q15.8 R1.2 R38.1 U6.3 U6.4 | length 1553.9
  Top Layer w25: v1(1345,589) R1.2@1381,589 ; v1(2493.3,354) 2509,354 ; 2554.5,399.5 2697,399.5 2685.56,388.06 2672.5,375
  Bottom Layer w12: 1560,85 1560,86
  Bottom Layer w25: v1(1345,589) 1293,537 1293,217 1369,141 v1(1369,98) ; v1(1936.37,84.83) 1936.37,275.37 2015,354 v1(2493.3,354)
  other v1: 1369,66.5 1567,66.5 1567,98
VCC##: C4.1 C5.1 D10.1 R1.1 U1.1
VCC_3V3: C40.1 C41.1 C45.1 C47.2 R6.2 R7.2 U8.1 U9.5 | length 3157.4
  Top Layer w12: C45.1@1176.59,597 C45.1@1180,600.41 ; U9.5@1395.44,1991.5 v1(1443.5,1991.5)
  Top Layer w25: v1@608.28,2110 1102.5,2110 1106,2113.5 v1(1106,2142.72)
  Bottom Layer w25: v1(606,2110) 562,2066 562,691 654,599 v1@1123,599 ; v1(1106,2142.72) 1106,2078 1156,2028 1304.41,2028 1336.41,1996 R6.2@1395,1996 v1@1443.5,1996 ; C40.1@1474.28,1996 C40.1@1476.78,1993.5 ; C40.1@1476.78,1992 C40.1@1476.78,1993.5 ; C47.2@1477,2092 1476.89,2091.89 1476.89,2043.11 C41.1@1476.78,2043 C40.1@1476.78,1993.5
  other v1: 978,599 1120,599 978,646 1120,646
VCC_5V: C1.1 C3.1 C7.1 C19.1 C20.1 C30.1 C32.1 c.1 D14.2 J4.1 LS1.1 P2.4 P3.2 R4.2 R10.1 R12.2 R13.1 R22.2 R23.2 R24.2 R25.2 R27.2 R32.2 R43.2 U1.3 U2.4 U2.6 U2.18 U5.6 U6.8 U8.4 U8.6 U10.3 U12.20 U13.19 | length 13909.4
  Top Layer w12: U2.18@999.65,2358.02 v1(950,2358.01) 950,2319.7 973.7,2296 1046.93,2296 v1(1049,2293.93) ; C3.1@1176.59,792.72 1180,789.32 U8.6@1180,745
  Top Layer w20: c.1@557.87,2511 557.87,2496.13 v1(600,2454) ; U2.6@665,2389.51 664.17,2390.34 633.55,2390.34 605.16,2418.73 605.16,2452.84 604,2454 v1(600,2454) ; U2.4@665,2452.5 611,2452.5 601.5,2452.5 v1(600,2454)
  Top Layer w25: R13.1@34.63,2654.02 89.61,2709 237,2709 P2.4@306,2778 478,2606 549,2606 v1(549,2839) ; 549,2595 549,2563.5 ; c.1@557.87,2511 549,2519.87 549,2563.5 ; 563.5,2549 549,2563.5 ; v1(954,2181) v1(1206,2181) ; v1@1836,2181 U13.19@1836,2121.61 1836,2070 1875,2031 2316,2031 v1(2398,2113) U12.20@2398,2168.61 ; R43.2@1939,1466 R32.2@1939,1526 R24.2@1939,1589 v1(1939,1619.5) R12.2@1939,1650 ; v1(2183,399) 2183,259 v1@2226,216 ; v1(2226.31,215.69) v1@2226,216 ; v1(2363,264) R22.2@2363,216 U5.6@2292.3,216 v1@2226,216 ; C30.1@2903.63,134.5 C30.1@2929.13,109 2931,107.13 2931,58
  Bottom Layer w20: P3.2@1657,2885 1724.28,2885 R25.2@1724.28,2863
  Bottom Layer w25: R23.2@498,2839 v1(549,2839) R4.2@713,2839 713,2798.64 733.96,2777.69 777.14,2777.69 778.45,2779 817.5,2779 820,2781.5 R27.2@820,2784 ; v1(600,2454) 718,2454 814.5,2357.5 950,2357.5 997.5,2357.5 1000,2360 C7.1@1000,2361 ; v1(954,2181) 954,2247 1000.93,2293.93 v1(1049,2293.93) ; v1(1095.5,741.5) v1(1255,741.5) 1360.5,741.5 1605,497 v1(1633,497) ; v1(1206,2181) v1(1835,2181) ; v1(1664.5,497) 2085,497 v1(2183,399) 2489,399 2599.5,509.5 2599.5,1298.5 ; R25.2@1731,2858 1943,2858 2078,2723 J4.1@2078,2547 2496,2547 2598,2649 R10.1@2598,2790 ; v1(1939,1619.5) 1968.5,1649 2249,1649 2599.5,1298.5 ; C20.1@2232,201 C19.1@2232,251 ; v1(2363,264) 2495,264 2738,21 2860,21 v1(2892,53) 2836,109 C32.1@2836,176.7 ; v1(2398,2113) 2493.72,2208.72 2999,2208.72 ; U10.3@2637,2885 2637,2867.61 2600.5,2831.11 2600.5,2792.5 R10.1@2598,2790 ; R10.1@2598,2790 2706,2790 2937,2559 2937,2270.72 2999,2208.72 ; 2599.5,1298.5 2840,1539 3286,1539 3522,1775 D14.2@3522,2208.72 2999,2208.72
VCC_M: C11.1 C12.1 C13.1 C16.1 C17.1 C18.1 D2.2 D3.2 R38.2 R39.1 U3.1 U4.1 | length 5255.7
  Top Layer w25: v1(259,1085) 490,1085 659.87,1254.87 C16.1@731,1254.87 731.13,1255 C18.1@847,1255 C17.1@896,1255 U4.1@961.7,1255 961.7,1329.04 982.67,1350 D3.2@989.26,1350 ; C11.1@1604,1252.87 1606.13,1255 U3.1@1844.7,1255 1844.7,1339.44 D2.2@1855.26,1350
  Top Layer w50: D3.2@981,1358.46 982.26,1357.2 D3.2@982.26,1350 ; 993,1465 1819,1465 1854.82,1429.18 1854.82,1350.43 D2.2@1855.26,1350
  Bottom Layer w25: v1(259,1085) 259,172 406,25 v1(2351.5,25)
VCC_M#: C22.1 C23.1 D11.1 R19.1 R39.2 | length 262.6
  Top Layer w25: R19.1@2423,115 2423.5,114.5 2423.5,59.5 R39.2@2424,59
  Bottom Layer w12: D11.1@2279.74,118 2289.54,118 2317,145.46
  Bottom Layer w25: D11.1@2279.74,109 D11.1@2295.49,109 ; 2313,59 C22.1@2420,59 2422,57 v1(2422,25)
VDIV: P3.3 R25.1 R26.1 | length 402.9
  Bottom Layer w20: P3.3@1557,2785 1596,2746 R26.1@1596,2708 1596,2673 1617,2652 1700,2652 1731,2683 1731,2797 R25.1@1734,2800
VS1: C14.1 P6.1 Q6.3 Q7.2 R16.1 U3.6 | length 299.2
  Top Layer w25: v1(1934,1194) 1972.31,1155.69 2056.61,1155.69 U3.6@2057.3,1155 2111.36,1155 2126,1169.64 C14.1@2126,1204 R16.1@2176.67,1204
  other v1: 1541,1528
VS2: C15.1 P7.1 Q8.3 Q9.2 U4.6 | length 728.4
  Top Layer w25: U4.6@1174.3,1155 1261,1155 1297,1191 C15.1@1297,1255 1360,1255 v1(1361,1254)
  Bottom Layer w25: Q9.2@824,975.12 Q9.2@850.57,975.12 ; 1345.5,1186.5 1361,1202 v1(1361,1254) Q8.3@1361,1351.38 ; Q8.3@1407.5,1368.62 1378.24,1368.62 Q8.3@1361,1351.38 ; v1(1434,1532) 1413.17,1511.17 1413.17,1447.05 Q8.3@1380,1413.88 1361,1394.88 Q8.3@1361,1351.38
VT: R49.2 U12.19 | length 593.9
  Top Layer w25: v1(2448,2083) U12.19@2448,2168.61 ; v1(2538,1650) R49.2@2576,1650
  Bottom Layer w25: v1(2448,2083) 2538,1993 v1(2538,1650)
XTAL1: C9.2 U2.7 X1.1 | length 451.3
  Top Layer w20: v1(424,2258) 493.16,2258 X1.1@493.69,2258.54 ; U2.7@665,2358.02 v1(714.48,2358)
  Bottom Layer w20: v1(424,2258) 524,2358 v1(714.48,2358)
XTAL2: C10.2 U2.8 X1.3 | length 85.1
  Top Layer w20: X1.3@580.31,2325.46 581.36,2326.52 U2.8@665,2326.52
pads on no net: U7.3 U7.7 U7.8 U8.2 U8.5 U9.15 U11.5 U11.9 U12.3 U12.4 U12.5 U12.6 U12.7 U12.8 U12.10 U12.11 U13.1 U13.4 U13.5 U13.6 U13.7 U13.8 U13.9 U13.18 U13.20

## Polygon pours and split planes (outlines as drawn)
GND on Top Layer "GND_L01_P000" (hatched 45Degree grid 20 track 8, remove dead copper, pour order 0): 93,2846 3548,2846 3548,86 93,86
GND on Bottom Layer "GND_L02_P001" (hatched 45Degree grid 20 track 8, remove dead copper, pour order 1): 93,2846 3548,2846 3548,86 93,86

## Other copper
Top Layer:
  region net PIN1: 218.16,1268.16 262,1312 182.8,1391.2 138.96,1347.36
  rectangle net VB2: 1084,1280 1246,1417
  rectangle net VCC#: 574,139 1132,317
  rectangle net NetLS1_2: 295,818 379,1058
  rectangle net VCC_M: 983,1308 1048,1473
  rectangle net VCC_M: 933,1242 1002,1490
  rectangle net RO1: 1367.06,1861.27 1424.06,1897.27
  rectangle net RO2: 1172,1861 1229,1897
  rectangle net GND: 1254,2089 1342,2203
  rectangle net GND: 713,1374 913,1929
  rectangle net VCC_5V: 506,2426 621,2645
  rectangle net RESET: 688,2875 890,2914
  region net GND: 521,2405 466,2405 466,2306 521,2306
  rectangle net XTAL2: 550.7,2302 587,2405
  rectangle net GND: 549.7,2184 587,2283
  region net XTAL1: 521,2283 483,2283 483,2184 521,2184
  rectangle net SHDN: 1381,2057 1487,2085
  rectangle net PATCH_ANT: 1577,2085 1672,2129
  region net GND: 1538,1058 1538,1419 1386,1419 1386,1058
  rectangle net GND: 1419,1318 1791,1419
  region net GND: 1881,1125 1224,1125 1224,1054.05 1881,1054.05
  region net GND: 1800,1079 831.76,1079 831.76,1011 1800,1011
  region net GND: 2540,1075.05 1854.76,1075.05 1854.76,922 2540,922
  region net GND: 1880,804.24 1880,1119 1754.05,1119 1754.05,804.24
  rectangle net SPOOL_SNS: 2154,1237 2454,1288
  rectangle net GND: 797,1295 913,1384
  rectangle net NetD11_2: 2032,303 2149,779
  rectangle net GND: 1985,816 2749,953
  rectangle net VB1: 1965,1246 2143,1383
  rectangle net VB2: 1138,1234 1253,1417
  region net GND: 846,1140 646,1140 646,815 846,815
  region net GND: 793,815 793,1055 401,1055 401,815
  rectangle net GND: 2508,816 3032,1289
  rectangle net IPP: 3236,210 3561,780
  region net GND: 1402,734 1402,776 1296,776 1296,734
  rectangle net GND: 2662,6 2700,303
  rectangle net IPK_SNS: 2243,417 2444,781
  rectangle net CII: 2290,88 2383,186
  rectangle net IPK_SNS: 2406,195 2444,449
  rectangle net VCC_5V: 2823,80 2870,223
  rectangle net GND: 3008,6 3186,389
  region net GND: 3121,6 3121,28 2671,28 2671,6
  rectangle net VCC_5V: 2858,42 2981,223
  rectangle net GND: 2671,6 2746,126
  rectangle net VCC_M#: 2399,8 2444,136
  rectangle net NetC37_1: 1386,434 1470,509
  region net VCC_3V3: 1188.59,578 1188.59,669 947,669 947,578
  rectangle net GND: 1278,688 1311,784
  rectangle net GND: 1160.59,678 1278,715
  rectangle net VCC_5V: 1592,476 1707,593
  rectangle net VCC_5V: 1225,726 1270,758
  rectangle net VCC#: 2481,339 2753,442
  rectangle net IPP: 2768,339 2859.56,476
  rectangle net IPP: 2480.91,455 3320,779
  rectangle net GND: 2642,816 3561,1149
  rectangle net VCC_5V: 295,585 801,799
  rectangle net VCC_5V: 295,725 986,799
  rectangle net VCC_M: 2290,8 2383,79
  rectangle net VCC#: 579,168.65 1555,235
  rectangle net GND: 400.17,373.65 1134,440
  region net VCC: 1314,378.78 1160,378.78 1160,258 1314,258
  region net GND: 2002,952 1756.33,952 1756.33,199 2002,199
  region net GND: 1871,199 1871,449 1583.78,449 1583.78,199
  region net GND: 1499,520 1499,564 1270,564 1270,520
  rectangle net GATE: 1335,259 1406,321
  rectangle net VCC: 1431,292 1467,373
  rectangle net VCC#: 574,18 1999,179
  rectangle net GND: 400,434 1369,557
  rectangle net VCC#: 1859,18 2267,85
  rectangle net VCC: 1431,258 1556,318
  rectangle net VCC: 1160,361 1469,416
  region net GND: 1221,715 1221,472 1311,472 1311,715
  region net VCC##: 1658,721 1359,721 1359,647 1658,647
  region net VCC##: 1692,998 1432,998 1432,647 1692,647
  region net VCC##: 1404,632 1404,721 1358,721 1358,632
  rectangle net GND: 1358,740 1402,817
  rectangle net GND: 1222,767 1402,1034
  rectangle net VCC_5V: 878,725 1191,996
  rectangle net SW2: 474,2874 676,2912
Bottom Layer:
  region net PIN1: 182.64,1391.04 138.8,1347.2 218,1268 261.84,1311.84
  rectangle net VCC_3V3: 550,517 1142,709
  rectangle net GND: 384,376 531,971
  region net VS2: 1041,799 1041,1230 892,1230 892,799
  rectangle net VS2: 897,1173 1361,1229.95
  rectangle net VCC: 1146,279 1206,381
  rectangle net RESET: 694.82,2880 770,2914
  rectangle net VCC_3V3: 1347,1970 1494,2013
  rectangle net GND: 1515,1867 1588,2061
  region net VS1: 1773.5,1185.5 1808.06,1220.06 1711.74,1316.38 1677.18,1281.82
  region net VS1: 1724,1247 1724,1321 1529,1321 1529,1247
  rectangle net VS1: 1528,1308 1582,1548
  region net VS2: 1482,1173 1482,1548 1333,1548 1333,1173
  region net VS1: 2370,1174 2370,1490 2244,1490 2244,1174
  rectangle net VS1: 1732,1174.05 2338,1231
  region net VS1: 1953.16,1152 1953.16,1211.18 1732,1211.18 1732,1152
  rectangle net IPP: 1438,697 1497,795
  rectangle net IPP: 1457,697 1990,763
  rectangle net IPP: 1976,698 2580,1164
  rectangle net NetD13_2: 660,1280 815.01,1617
  rectangle net NetD12_2: 1124.01,1278 1269.01,1617
  rectangle net NetD8_2: 1590,1331 1723.9,1620
  rectangle net NetD5_2: 2039,1330 2184,1619
  rectangle net NetD11_2: 2057.65,46 2176,150
  rectangle net VCC_M#: 2223,46 2336,150
  rectangle net VCC_M#: 2265,46 2336,215
  rectangle net VCC_5V: 2211,178 2254,273
  rectangle net GND: 2110,178 2192,273
  rectangle net NetC21_2: 2019,183 2085,228
  rectangle net VCC: 384,155 1206,345
  rectangle net GND: 1408,199 1668,316
  rectangle net VCC#: 1353,49 1583,157
  pour cut-out: 2018,757 2373,757 2373,407 2018,407

## Silkscreen, mask and mechanical layers (free items; w line width, h text height)
Top Overlay:
  lines w10: 925,1078 939,1064 988,1064 1015,1037 1033,1037 ; 1407,1564 1684,1564 1684,1488 1280,1488 1280,1564 1419,1564 ; 1476,1879 1476,1911 ; 1680,1992 1694,1992
  text "EXT-SW" at 471,2758.53 h50
  text "RESET" at 685,2758.41 h50
  text "LCD HEADER" at 911,2668.59 h70
  text "JTAG" at 151,2658.01 h70
  text "SRX882-433MHZ MODULE" at 2471,2449 h70
  text "EXTERNAL INPUTS" at 74.99,1988 h70 r90
  text "MOTOR" at 1382,1572.7 h60
  text "-ve" at 1293.37,1506 h60
  text "+ve" at 1562.75,1506 h60
  text "*" at 834,1388.91 h75 r180
  text "HC12 MODULE" at 3063,1358.5 h70 r90
  text "*" at 1712,1253.91 h75 r180
  text "EXTERNAL INPUTS" at 74.99,1105.5 h70 r90
  text "*" at 1336.45,832.48 h75 r180
  text "*" at 1261,830.91 h75 r180
  text "*" at 1261,634.91 h75 r180
  text "BUZZER" at 74.99,634 h70 r90
  text "*" at 1337,397.91 h75 r180
  text "*" at 1392,397.91 h75 r180
  text "*" at 2450,203.91 h75 r180
  text "INPUT" at 74.99,115.5 h70 r90
Bottom Overlay:
  drawing of 3053 lines, arcs and shapes, not listed
  text "#" at 525,2914.41 h55 r180
  text "#" at 659,2914.41 h55 r180
  text "Note:" at 3301,2880 h75
  text "*>> 0.1uF" at 3306,2811.76 h75
  text "#" at 768,2801.41 h55 r180
  text "#>> 4.7K" at 3306,2749.11 h75
  text "#" at 385,2637.41 h55 r180
  text "#" at 386,2493.41 h55 r180
  text "*" at 984.07,2422.74 h75
  text "*" at 985.07,2284.74 h75
  text "#" at 333,2283.41 h55 r180
  text "*" at 1562,2006.09 h75
  text "*" at 1327,1945.09 h75
  text "ZERO CARBON FOOTPRINT" at 2942,1879 h45
  text "GND" at 407.98,386 h85
  text "*" at 2330,331.91 h75 r180
  text "*" at 2920.91,306 h75 r90
  text "*" at 2282.47,239.3 h75 r180
  text "VCC" at 407.98,186 h85
  text "*" at 2911.91,161 h75 r90
Board Dimension:
  the board outline again, w10
Fabrication:
  drawing of 332 lines, arcs and shapes, not listed
  text "Layer" at 4061.2,3708.46 h60
  text "Name" at 4471.11,3708.46 h60
  text "Material" at 5400.85,3708.46 h60
  text "Thickness" at 6260.62,3708.46 h60
  text "Constant" at 6910.46,3708.46 h60
  text "Board Layer Stack" at 7480.32,3708.46 h60
  text "Top Overlay" at 4471.11,3588.46 h60
  text "Top Solder" at 4471.11,3468.46 h60
  text "Solder Resist" at 5400.85,3468.46 h60
  text "0.50mil" at 6260.62,3468.46 h60
  text "3.5" at 6910.46,3468.46 h60
  text "1" at 4061.2,3348.46 h60
  text "Top Layer" at 4471.11,3348.46 h60
  text "12.50mil" at 6260.62,3348.46 h60
  text "Dielectric 1" at 4471.11,3228.46 h60
  text "FR-4" at 5400.85,3228.46 h60
  text "37.00mil" at 6260.62,3228.46 h60
  text "4.8" at 6910.46,3228.46 h60
  text "2" at 4061.2,3108.46 h60
  text "Bottom Layer" at 4471.11,3108.46 h60
  text "12.50mil" at 6260.62,3108.46 h60
  text "Bottom Solder" at 4471.11,2988.46 h60
  text "Solder Resist" at 5400.85,2988.46 h60
  text "0.50mil" at 6260.62,2988.46 h60
  text "3.5" at 6910.46,2988.46 h60
  text "Bottom Overlay" at 4471.11,2868.46 h60
Drill Drawing:
  circle w10: c-476.98,4473.33 r33.33
  lines w10: -510.31,4140 -510.31,4156.67 -493.64,4173.33 -510.31,4190 -510.31,4206.67 -493.64,4206.67 -476.98,4190 -460.31,4206.67 -443.64,4206.67 -443.64,4190 -460.31,4173.33 -443.64,4156.67 -443.64,4140 -460.31,4140 -476.98,4156.67 -493.64,4140 -510.31,4140 ; -510.31,4290 -443.64,4290 -443.64,4356.67 -510.31,4356.67 -510.31,4290 ; -510.31,4656.67 -443.64,4656.67 -476.98,4590 -510.31,4656.67 ; -510.31,4740 -476.98,4756.67 -443.64,4740 -460.31,4773.33 -443.64,4806.67 -476.98,4790 -510.31,4806.67 -493.64,4773.33 -510.31,4740 ; -510.31,4906.67 -493.64,4906.67 -493.64,4890 -460.31,4890 -460.31,4906.67 -443.64,4906.67 -443.64,4940 -460.31,4940 -460.31,4956.67 -493.64,4956.67 -493.64,4940 -510.31,4940 -510.31,4906.67 ; -510.31,5056.67 -493.64,5056.67 -476.98,5040 -460.31,5056.67 -443.64,5056.67 -460.31,5073.33 -443.64,5090 -460.31,5090 -476.98,5106.67 -493.64,5090 -510.31,5090 -493.64,5073.33 -510.31,5056.67
  lines w15: -570.1,4095 9970.98,4095 ; -570.1,5145 9970.98,5145 ; -19.22,3945 -19.22,5295 ; 580.62,3945 580.62,5295 ; 1680.3,3945 1680.3,5295 ; 2186.17,3945 2186.17,5295 ; 2919.97,3945 2919.97,5295 ; 4419.52,3945 4419.52,5295 ; 5009.37,3945 5009.37,5295 ; 5755.17,3945 5755.17,5295 ; 6405,3945 6405,5295 ; 7258.76,3945 7258.76,5295 ; 8592.37,3945 8592.37,5295 ; -570.1,3945 9970.98,3945 9970.98,5295 -570.1,5295 -570.1,3945
  text "Symbol" at -480.1,5190 h72
  text "Count" at 25.78,5190 h72
  text "Hole Size" at 625.62,5190 h72
  text "Plated" at 1725.3,5190 h72
  text "Hole Type" at 2231.17,5190 h72
  text "Drill Layer Pair" at 2964.97,5190 h72
  text "Via/Pad" at 4464.52,5190 h72
  text "Pad Shape" at 5054.37,5190 h72
  text "Template" at 5800.17,5190 h72
  text "Description" at 6450,5190 h72
  text "Hole Tolerance (+)" at 7303.76,5190 h72
  text "Hole Tolerance (-)" at 8637.37,5190 h72
  text "2" at 25.78,5040 h60
  text "41.73mil (1.060mm)" at 625.62,5040 h60
  text "PTH" at 1725.3,5040 h60
  text "Round" at 2231.17,5040 h60
  text "Top Layer - Bottom Layer" at 2964.97,5040 h60
  text "Pad" at 4464.52,5040 h60
  text "Rounded" at 5054.37,5040 h60
  text "c200h106" at 5800.17,5040 h60
  text "4" at 25.78,4890 h60
  text "78.74mil (2.000mm)" at 625.62,4890 h60
  text "PTH" at 1725.3,4890 h60
  text "Round" at 2231.17,4890 h60
  text "Top Layer - Bottom Layer" at 2964.97,4890 h60
  text "Pad" at 4464.52,4890 h60
  text "Rounded" at 5054.37,4890 h60
  text "c250h200" at 5800.17,4890 h60
  text "6" at 25.78,4740 h60
  text "66.93mil (1.700mm)" at 625.62,4740 h60
  text "PTH" at 1725.3,4740 h60
  text "Round" at 2231.17,4740 h60
  text "Top Layer - Bottom Layer" at 2964.97,4740 h60
  text "Pad" at 4464.52,4740 h60
  text "(Mixed)" at 5054.37,4740 h60
  text "(Mixed)" at 5800.17,4740 h60
  text "8" at 25.78,4590 h60
  text "35.43mil (0.900mm)" at 625.62,4590 h60
  text "PTH" at 1725.3,4590 h60
  text "Round" at 2231.17,4590 h60
  text "Top Layer - Bottom Layer" at 2964.97,4590 h60
  text "Pad" at 4464.52,4590 h60
  text "(Mixed)" at 5054.37,4590 h60
  text "(Mixed)" at 5800.17,4590 h60
  text "20" at 25.78,4440 h60
  text "40.16mil (1.020mm)" at 625.62,4440 h60
  text "PTH" at 1725.3,4440 h60
  text "Round" at 2231.17,4440 h60
  text "Top Layer - Bottom Layer" at 2964.97,4440 h60
  text "Pad" at 4464.52,4440 h60
  text "Rounded" at 5054.37,4440 h60
  text "c200h102" at 5800.17,4440 h60
  text "22" at 25.78,4290 h60
  text "39.37mil (1.000mm)" at 625.62,4290 h60
  text "PTH" at 1725.3,4290 h60
  text "Round" at 2231.17,4290 h60
  text "Top Layer - Bottom Layer" at 2964.97,4290 h60
  text "Pad" at 4464.52,4290 h60
  text "(Mixed)" at 5054.37,4290 h60
  text "(Mixed)" at 5800.17,4290 h60
  text "196" at 25.78,4140 h60
  text "11.81mil (0.300mm)" at 625.62,4140 h60
  text "PTH" at 1725.3,4140 h60
  text "Round" at 2231.17,4140 h60
  text "Top Layer - Bottom Layer" at 2964.97,4140 h60
  text "Via" at 4464.52,4140 h60
  text "Rounded" at 5054.37,4140 h60
  text "(Mixed)" at 5800.17,4140 h60
  text "258 Total" at 25.78,3990 h60

## Dimensions
3621,2945 to 3621,0 on Draft and Dimensions
0,2945 to 3621,2945 on Draft and Dimensions